# Altium PCB POD-Design-v1.0.PcbDoc (part 7 of 8)
Units mil, origin at the board's own origin, x right, y up, seen from the top; angles counter-clockwise.
Board outline 5511.81 x 3937.01 mil, 4 copper layers (Top Layer, Layer 1, Layer 2, Bottom Layer), stack 61.653 mil thick; 347 components, 252 nets, 1015 pads, 412 vias.
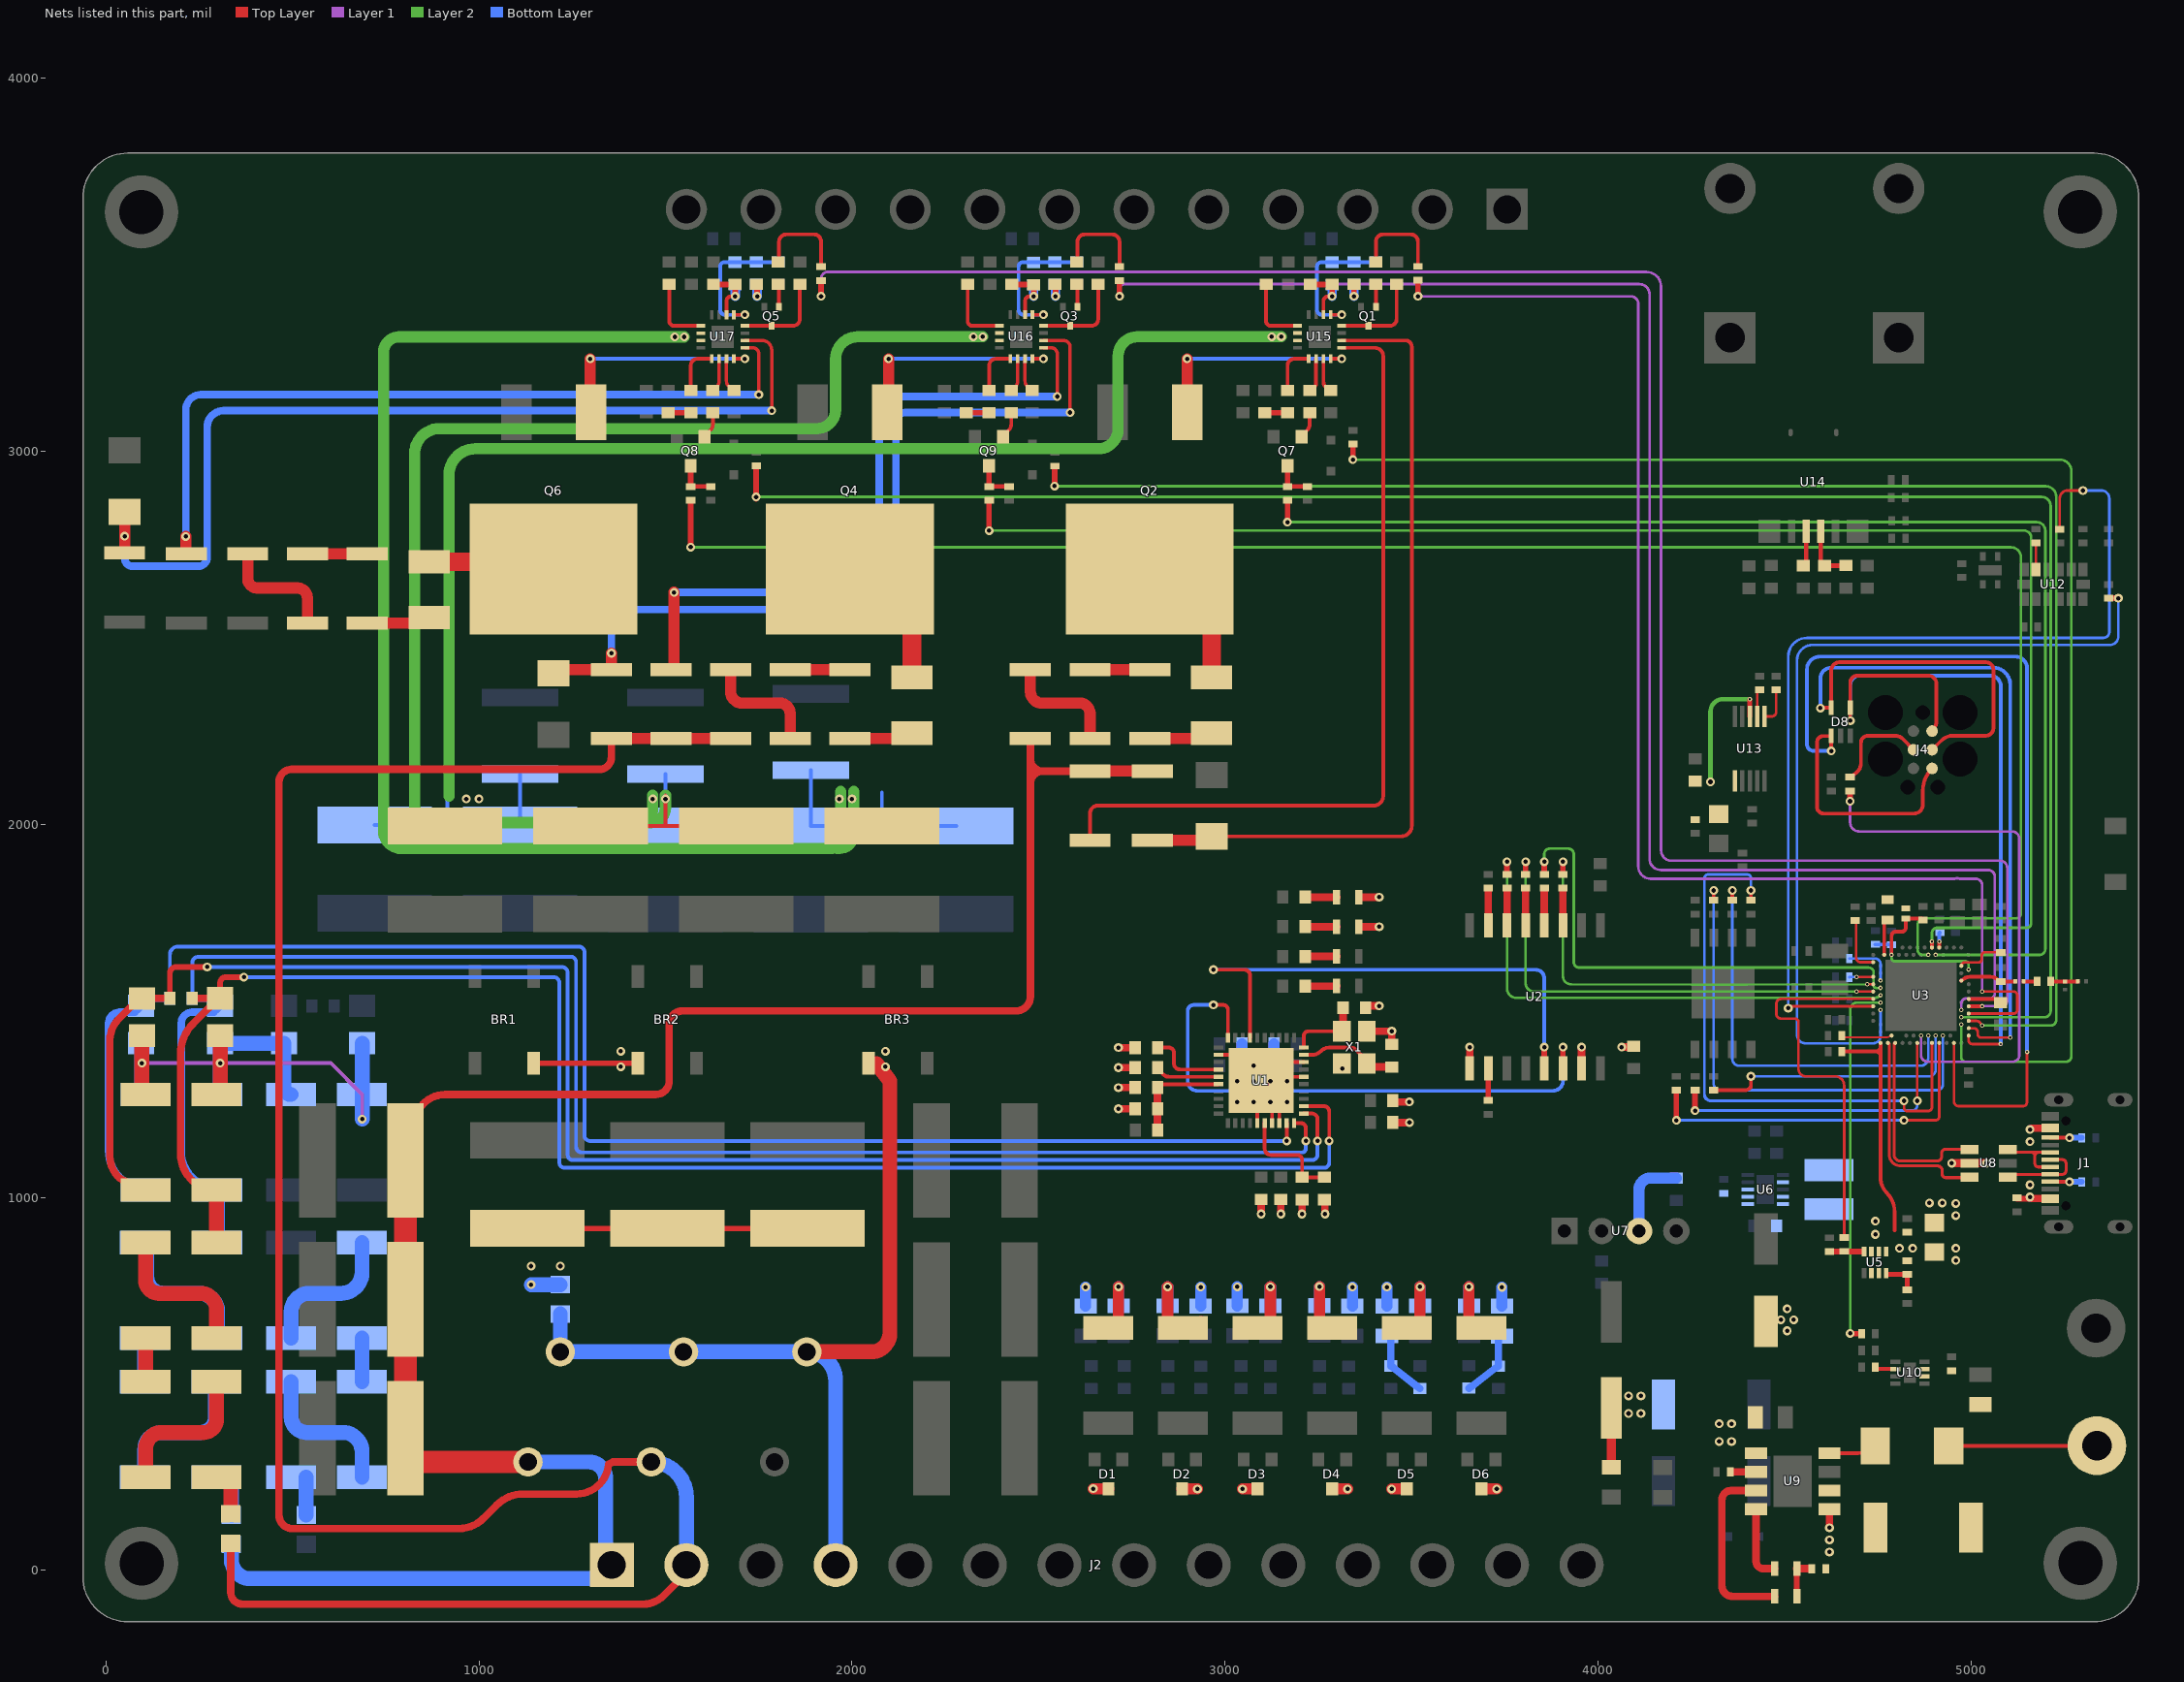
[diagram p5: the nets of this part, all layers, seen from the top]

## Via types
v1: diameter 23.62, hole 11.81, Top Layer to Bottom Layer, tented both sides, 381 vias
v2: diameter 11.81, hole 5.91, Top Layer to Bottom Layer, tented both sides, 30 vias
v3: diameter 15.75, hole 5.91, Top Layer to Bottom Layer, tented both sides, 1 vias

## Nets (pads, with @x,y where several pads share a name; then routed paths per layer and width w, separated by ;. In a path a pad name is that pad's centre, name@x,y a point inside that pad or via, vN(x,y) a via of type N, cw(c..) or ccw(c..) an arc to the next point about the centre after c; other vN are vias at no path point) (continued)
NetC9_2: C9.2 U1.30 X1.3 | length 209.7
  Top Layer w10: U1.30@3210.97,1402.08 3210.97,1432.27 cw(c3224.41,1432.27) 3224.41,1445.71 X1.3@3313.03,1445.71 ccw(c3313.03,1449.17) X1.3@3316.5,1449.17
  Top Layer w20: X1.3@3316.5,1449.17 C9.2@3316.5,1513.5
NetC10_2: C10.2 U1.29 X1.1 | length 236.6
  Top Layer w10: U1.29@3210.97,1382.4 3233.48,1382.4 ccw(c3233.48,1415.69) 3257.02,1392.15 ; 3257.04,1392.18 cw(c3280.56,1368.62) 3280.56,1401.9 3334.3,1401.9 cw(c3334.3,1375.9) 3352.69,1394.28 X1.1@3363.48,1383.49 ; X1.1@3379.96,1359.09 ccw(c3389.14,1359.09) X1.1@3389.14,1349.91
  Top Layer w20: X1.1@3389.14,1349.91 C10.2@3447.1,1349.91
NetC11_2: C11.2 R15.2 R16.1 | length 179.9
  Bottom Layer w20: C11.2@3444.17,629.42 R15.2@3444.17,548.28 3451.67,543.28 3515.08,493.28 R16.1@3522.58,488.28
NetC13_1: C13.1 R19.2 R20.1 | length 179.3
  Bottom Layer w20: R20.1@3654.16,488.79 3661.66,493.79 3725.08,542.76 R19.2@3732.58,547.76 C13.1@3732.58,628.9
NetC35_2: C35.2 C36.2 C44.1 L1.2 U3.B5 U3.E24 | length 483.6
  Top Layer w10: v2(4786.87,1650.41) 4786.87,1701.68 cw(c4797.46,1701.68) 4797.46,1712.26 4813.78,1712.26 ccw(c4813.78,1723.57) 4825.09,1723.57 L1.2@4825.09,1747.22 4868.04,1747.22 cw(c4868.04,1743.63) C35.2@4871.63,1743.63
  Layer 2 w7: v2(4786.87,1650.41) 4786.87,1641.46 ccw(c4794.94,1641.46) 4794.94,1633.39 4983.66,1633.39 cw(c4983.66,1623.48) 4993.57,1623.48 v2(4993.57,1611.04)
  Bottom Layer w10: C36.2@4743.6,1678.2 4786.87,1678.2 C44.1@4786.87,1677.5 v2(4786.87,1650.41)
NetC37_1: C37.1 U3.A18 | length 40.9
  Top Layer w10: U3.A18@4914.83,1670.09 v2(4914.83,1686.01)
  Bottom Layer w10: v2(4914.83,1686.01) 4914.83,1708.3 cw(c4916.57,1708.3) C37.1@4916.57,1710.05
NetC42_1: C42.1 U3.D23 | length 130.7
  Top Layer w7: U3.D23@4973.88,1620.88 cw(c4982.95,1620.88) 4982.95,1629.95 5020.05,1629.95 ccw(c5020.05,1638.37) 5028.46,1638.37 5028.46,1648.59 cw(c5036.88,1648.59) 5036.88,1657.01 C42.1@5079.62,1657.01
NetC43_2: C43.2 U3.C1 | length 152.4
  Top Layer w7: C43.2@4692,1742.5 4692,1642.46 ccw(c4703.73,1642.46) 4703.73,1630.72 U3.C1@4737.66,1630.72
NetC45_1: C45.1 L3.2 | length 36.4
  Top Layer w10: L3.2@5140.63,1578.87 C45.1@5176.99,1578.87
NetC45_2: C45.2 L4.1 L5.2 | length 72.5
  Top Layer w10: C45.2@5213.99,1578.87 L4.1@5286.49,1578.88
NetC48_2: C48.2 L3.1 U3.H23 | length 151.6
  Top Layer w10: U3.H23@4973.88,1581.51 4982.94,1587.51 ccw(c4973.88,1601.2) 4983.63,1588 cw(c4989.54,1579.92) 4986.06,1589.3 cw(c4997.68,1557.71) 4997.68,1591.37 5051.59,1591.37 cw(c5051.59,1562.35) 5072.11,1582.87 5076.11,1578.87 C48.2@5079.61,1578.87 L3.1@5118.98,1578.87
NetC49_2: C49.2 U3.N24 | length 89.2
  Top Layer w10: U3.N24@4993.57,1532.3 5074.07,1532.3 cw(c5074.07,1526.76) C49.2@5079.61,1526.76
NetC51_2: C51.2 U3.AC5 | length 136.2
  Top Layer w5: C51.2@4653.5,1433.87 4657.66,1429.72 4775.26,1429.72 ccw(c4775.26,1443.91) 4785.3,1433.87 U3.AC5@4786.87,1433.87
NetC60_2: C60.2 U6.6 U6.7 U6.8
NetC69_2: C69.2 C70.2 FB6.1 U13.1 U13.8 | length 359
  Top Layer w12: U13.8@4406.71,2289.37 v2(4406.71,2335.72)
  Layer 2 w12: v1(4301.42,2114.02) 4301.42,2302.36 cw(c4334.78,2302.36) 4334.78,2335.72 v2(4406.71,2335.72)
NetC72_1: C72.1 R84.2 R85.2 | length 158.7
  Top Layer w25: R84.2@4035.43,276.85 C72.1@4035.43,435.51
  other v1: 4081.76,421 4115,421 4081.76,468.24 4115,468.24
NetC75_2: C75.2 U14.3 | length 95.4
  Top Layer w10: C75.2@4549.67,2693.59 C75.2@4557.91,2701.83
  Top Layer w12: C75.2@4557.91,2701.83 U14.3@4557.91,2785.6
NetC77_2: C77.2 R88.2 U14.4 | length 152.3
  Top Layer w10: C77.2@4597.28,2702.11 ccw(c4613.04,2702.11) C77.2@4601.89,2690.96 ; C77.2@4607.98,2693.58 C77.2@4608.02,2693.62
  Top Layer w12: C77.2@4597.28,2702.11 U14.4@4597.28,2785.6 ; C77.2@4608.02,2693.62 R88.2@4664.35,2693.62
NetC82_2: C82.2 R99.2 R102.2 R104.2 U15.2 U15.3 | length 4022.3
  Layer 2 w30: 919.23,2075.46 919.23,2935.69 cw(c990.63,2935.69) 990.63,3007.08 2660.61,3007.08 ccw(c2660.61,3059.89) 2713.43,3059.89 2713.43,3256.12 cw(c2764.3,3256.12) 2764.3,3307 v1(3125.18,3307) v1(3150.79,3307)
  Bottom Layer w10: R99.2@720,1998.11 914.99,1998.11 ; 914.99,2105.55 914.99,1998.11 ; C82.2@1110,2135 R104.2@1110,1998.11 914.99,1998.11
  other v1: 966,2068.08 1000,2068.08
NetC83_2: C83.2 R100.1 R105.2 U15.14 | length 193.1
  Top Layer w10: U15.14@3263.86,3366.03 3263.86,3375.8 3263.86,3402.6 cw(c3276.79,3402.6) 3276.79,3415.54 3287.23,3415.54 v1@3287.44,3415.73 ; R100.1@3287.44,3443.17 R100.1@3287.44,3447.41
  Top Layer w15: C83.2@3229.04,3447.4 3287.43,3447.4 v1@3287.43,3415.73
  Bottom Layer w25: v1(3287.02,3415.73) R105.2@3287.02,3446.88
NetC84_2: C84.2 U15.1 | length 190.1
  Top Layer w10: C84.2@3110.16,3447.4 3110.16,3349.24 ccw(c3122.85,3349.24) 3122.85,3336.56 U15.1@3194.88,3336.56
NetC85_1: C85.1 R106.1 | length 61.7
  Top Layer w10: C85.1@3106.7,3102.95 C85.1@3106.7,3103.47
  Top Layer w15: C85.1@3106.7,3103.47 R106.1@3167.88,3103.47
NetC86_2: C86.2 R105.1 R149.1 U15.13 | length 383.9
  Top Layer w10: U15.13@3284.13,3366.15 v1(3312.99,3366.14)
  Bottom Layer w10: v1(3312.99,3366.14) 3259.42,3366.14 cw(c3259.42,3378.81) 3246.75,3378.81 3246.75,3495.95 cw(c3257.69,3495.95) 3257.69,3506.88 R105.1@3287.02,3506.88 3404.44,3506.88 C86.2@3404.44,3507.4
NetC87_2: C87.2 Q1.3 U15.12 | length 250.3
  Top Layer w10: U15.12@3312.99,3336.56 Q1.3@3384.75,3336.61 Q1.3@3384.75,3336.61 3442.28,3336.61 ccw(c3442.28,3354.34) 3460,3354.34 C87.2@3460,3447.4
NetC88_2: C88.2 R114.2 U15.10 | length 2199.2
  Top Layer w10: C88.2@2954.07,1957.68 ccw(c2954.07,1967.81) C88.2@2964.21,1967.81 3472.09,1967.81 ccw(c3472.09,1996.41) 3500.69,1996.41 3500.69,3280.33 ccw(c3483.77,3280.33) 3483.77,3297.25 U15.10@3312.99,3297.25
  Top Layer w30: R114.2@2804.87,1957.68 C88.2@2954.07,1957.68
NetC91_2: C91.2 R116.2 R119.2 R121.2 U16.2 U16.3 | length 4163.6
  Top Layer w10: R119.2@1299.22,1996.22 1500,1996.22 ; v1@1500,2078.08 1500,1996.22 ; R116.2@1689.61,1996.22 1500,1996.22
  Layer 2 w30: 1426.51,2004.9 ccw(c1426.51,2044.39) 1466,2044.39 v1@1466,2078.08 ; v1@1500,2078.08 1500,2044.39 cw(c1460.51,2044.39) 1460.51,2004.9 877.78,2004.9 cw(c877.78,2055.1) 827.58,2055.1 827.58,2993.84 cw(c894.85,2993.84) 894.85,3061.11 1906.34,3061.11 ccw(c1906.34,3110.88) 1956.1,3110.88 1956.1,3248.03 cw(c2015.07,3248.03) 2015.07,3307 v1(2350.79,3307)
  Bottom Layer w10: R121.2@1500,1996.22 1500,2078.08 C91.2@1500,2135
  other v1: 1466,2068.08 1500,2068.08 2325.18,3307
NetC92_2: C92.2 R117.1 R122.2 U16.14 | length 193.1
  Top Layer w10: U16.14@2463.86,3366.03 2463.86,3375.8 2463.86,3402.6 cw(c2476.79,3402.6) 2476.79,3415.54 2487.23,3415.54 v1@2487.44,3415.73 ; R117.1@2487.44,3443.17 R117.1@2487.44,3447.41
  Top Layer w15: C92.2@2429.04,3447.4 2487.43,3447.4 v1@2487.43,3415.73
  Bottom Layer w25: v1(2487.02,3415.73) R122.2@2487.02,3446.88
NetC93_2: C93.2 U16.1 | length 190.1
  Top Layer w10: C93.2@2310.16,3447.4 2310.16,3349.24 ccw(c2322.85,3349.24) 2322.85,3336.56 U16.1@2394.88,3336.56
NetC94_1: C94.1 R123.1 | length 61.7
  Top Layer w10: C94.1@2306.7,3102.95 C94.1@2306.7,3103.47
  Top Layer w15: C94.1@2306.7,3103.47 R123.1@2367.88,3103.47
NetC95_2: C95.2 R122.1 R151.1 U16.13 | length 383.9
  Top Layer w10: U16.13@2484.13,3366.15 v1(2512.99,3366.14)
  Bottom Layer w10: v1(2512.99,3366.14) 2459.42,3366.14 cw(c2459.42,3378.81) 2446.75,3378.81 2446.75,3495.95 cw(c2457.69,3495.95) 2457.69,3506.88 R122.1@2487.02,3506.88 2604.44,3506.88 C95.2@2604.44,3507.4
NetC96_2: C96.2 Q3.3 U16.12 | length 250.3
  Top Layer w10: U16.12@2512.99,3336.56 Q3.3@2584.75,3336.61 Q3.3@2584.75,3336.61 2642.28,3336.61 ccw(c2642.28,3354.34) 2660,3354.34 C96.2@2660,3447.4
NetC97_2: C97.2 R131.2 U16.10 | length 2303.6
  Top Layer w9: U16.10@2512.57,3297.13 2567.39,3297.13 cw(c2567.39,3279.79) 2584.73,3279.79 v1(2584.73,3104.09)
  Top Layer w10: C97.2@1200,2404.85 cw(c1210.13,2404.85) C97.2@1210.13,2414.98
  Top Layer w30: C97.2@1210.13,2414.98 R131.2@1355,2414.98 v1(1355,2459)
  Bottom Layer w20: v1(1355,2459) 1355,2549.11 cw(c1382.03,2549.11) 1382.03,2576.14 2090.63,2576.14 ccw(c2090.63,2603.51) 2118,2603.51 2118,3079.85 cw(c2142.25,3079.85) 2142.25,3104.09 v1(2584.73,3104.09)
NetC100_2: C100.2 R133.2 R136.2 R138.2 U17.2 U17.3 | length 4362.9
  Top Layer w10: R136.2@2054.39,2021.83 R136.2@2080,1996.22
  Layer 2 w30: v1(1550.38,3306.88) v1(1524.77,3306.88) 785.88,3306.88 ccw(c785.88,3265) 744,3265 744,1983.84 ccw(c792.61,1983.84) 792.61,1935.23 1928.25,1935.23 ; 1928.16,1935.23 ccw(c1928.16,1970.46) 1928.25,1935.23 ; 1946.12,1935.23 1928.25,1935.23 ; 1960.51,1934.9 ccw(c1960.51,1974.39) 1975.85,1938 1946.12,1938 ; 1970.26,1974.39 cw(c1930.77,1974.39) 1946.12,1938 ; 1970.26,1983.35 1970.26,2088.08 ; 1980.12,1938 ccw(c1964.77,1974.39) 2004.26,1974.39 ; 2004.26,1995.94 2004.26,2088.08 ; 1928.25,1935.23 ccw(c1928.16,1970.46) 1941.85,1938 1946.12,1938
  Bottom Layer w10: C100.2@1890,2145 R138.2@1890,1995.94 2085,1995.94 ; 2080,2085.87 2080,2000.94 ccw(c2085,2000.94) 2085,1995.94 ; R133.2@2280,1996.22 2280,1995.94 2085,1995.94
  other v1: 1966,2068.08 2000,2068.08
NetC101_2: C101.2 R134.1 R139.2 U17.14 | length 193.1
  Top Layer w10: U17.14@1663.44,3366.03 1663.44,3375.8 1663.44,3402.6 cw(c1676.38,3402.6) 1676.38,3415.53 1686.82,3415.53 v1(1687.02,3415.73) ; R134.1@1687.02,3443.17 R134.1@1687.01,3447.4
  Top Layer w15: C101.2@1628.63,3447.39 R134.1@1687.01,3447.4 v1(1687.02,3415.73)
  Bottom Layer w25: v1(1687.02,3415.73) R139.2@1687.02,3446.88
NetC102_2: C102.2 U17.1 | length 190.1
  Top Layer w10: C102.2@1510.16,3447.4 1510.16,3349.24 ccw(c1522.85,3349.24) 1522.85,3336.56 U17.1@1594.88,3336.56
NetC103_1: C103.1 R140.1 | length 61.7
  Top Layer w10: C103.1@1506.7,3102.95 C103.1@1506.7,3103.47
  Top Layer w15: C103.1@1506.7,3103.47 R140.1@1567.88,3103.47
NetC104_2: C104.2 R139.1 R150.1 U17.13 | length 383.9
  Top Layer w10: U17.13@1684.13,3366.15 v1(1712.99,3366.14)
  Bottom Layer w10: v1(1712.99,3366.14) 1659.42,3366.14 cw(c1659.42,3378.81) 1646.75,3378.81 1646.75,3495.95 cw(c1657.69,3495.95) 1657.69,3506.88 R139.1@1687.02,3506.88 1804.44,3506.88 C104.2@1804.44,3507.4
NetC105_2: C105.2 Q5.3 U17.12 | length 250.3
  Top Layer w10: U17.12@1712.99,3336.56 Q5.3@1784.75,3336.61 Q5.3@1784.75,3336.61 1842.28,3336.61 ccw(c1842.28,3354.34) 1860,3354.34 C105.2@1860,3447.41
NetC106_2: C106.2 R148.2 U17.10 | length 2564.8
  Top Layer w9: U17.10@1712.57,3297.13 1759.3,3297.13 cw(c1759.3,3271.69) 1784.73,3271.69 v1@1784.73,3104.09
  Top Layer w30: R148.2@44.57,2732.95 ccw(c50,2732.95) R148.2@50,2727.52 ; C106.2@44.57,2832.19 cw(c50,2832.19) C106.2@50,2837.62 ; R148.2@50,2732.95 v1(50,2772.43) C106.2@50,2832.19
  Bottom Layer w20: v1(50,2772.43) 50,2713.42 ccw(c71.42,2713.42) 71.42,2692 248.03,2692 ccw(c248.03,2715.36) 271.39,2715.36 271.39,3065.18 cw(c315.3,3065.18) 315.3,3109.09 v1(1784.73,3109.09)
NetC107_1: C107.1 R149.2 | length 63.4
  Top Layer w10: v1@3345.71,3415.73 v1(3345.77,3415.73)
  Top Layer w15: v1@3345.71,3415.73 C107.1@3345.71,3447.38
  Bottom Layer w10: v1@3345.71,3415.73 v1(3345.77,3415.73)
  Bottom Layer w25: v1@3345.71,3415.73 R149.2@3345.71,3447.38
NetC108_1: C108.1 R150.2 | length 63.4
  Top Layer w10: v1@1745.71,3415.73 v1(1745.77,3415.73)
  Top Layer w15: v1@1745.71,3415.73 C108.1@1745.71,3447.38
  Bottom Layer w10: v1@1745.71,3415.73 v1(1745.77,3415.73)
  Bottom Layer w25: v1@1745.71,3415.73 R150.2@1745.71,3447.38
NetC109_1: C109.1 R151.2 | length 63.4
  Top Layer w10: v1@2545.71,3415.73 v1(2545.77,3415.73)
  Top Layer w15: v1@2545.71,3415.73 C109.1@2545.71,3447.38
  Bottom Layer w10: v1@2545.71,3415.73 v1(2545.77,3415.73)
  Bottom Layer w25: v1@2545.71,3415.73 R151.2@2545.71,3447.38
NetD9_1: D9.1 Q2.2 | length 413.3
  Top Layer w10: Q2.2@2798.2,2684.38 2864.21,2684.38 cw(c2864.21,2584.38) Q2.2@2964.21,2584.38
  Top Layer w50: D9.1@2964.21,2394.15 Q2.2@2964.21,2584.38
NetD9_2: D9.2 R112.2 | length 174.2
  Top Layer w30: R112.2@2798.36,2229.92 2949.59,2229.92 ccw(c2949.59,2244.54) D9.2@2964.21,2244.54
NetD10_1: D10.1 Q4.2 | length 413.3
  Top Layer w10: Q4.2@1994.47,2684.38 2060.48,2684.38 cw(c2060.48,2584.38) Q4.2@2160.48,2584.38
  Top Layer w50: D10.1@2160.48,2394.15 Q4.2@2160.48,2584.38
NetD10_2: D10.2 R129.2 | length 174.2
  Top Layer w30: R129.2@1994.63,2229.92 2145.86,2229.92 ccw(c2145.86,2244.54) D10.2@2160.48,2244.54
NetD11_1: D11.1 Q6.2 | length 342.2
  Top Layer w10: Q6.2@1180.23,2704.15 Q6.2@1200,2684.38
  Top Layer w50: D11.1@866.01,2704.15 Q6.2@1180.23,2704.15
NetD11_2: D11.2 R146.2 | length 174.2
  Top Layer w30: R146.2@700.16,2539.92 851.39,2539.92 ccw(c851.39,2554.54) D11.2@866.01,2554.54
NetFB1_2: FB1.2 R30.1 | length 101.3
  Bottom Layer w40: FB1.2@336.39,148.82 R30.1@336.39,250.08
NetFB2_2: FB2.2 R36.1 | length 101.4
  Top Layer w15: R36.1@296.39,250.08 cw(c296.39,244.89) R36.1@301.58,244.89
  Top Layer w40: FB2.2@334.58,151.68 R36.1@334.58,244.89
NetFB3_2: FB3.2 R42.1 | length 101.3
  Bottom Layer w40: FB3.2@536.52,148.82 R42.1@536.52,250.08
NetJ4_3: J4.3 R91.1 | length 270.9
  Top Layer w10: R91.1@4675.62,2126.62 4683.12,2130.62 4695.11,2141.38 ccw(c4675.62,2163.13) 4704.83,2163.13 4704.83,2219.18 cw(c4723.37,2219.18) 4723.37,2237.73 4796,2237.73 cw(c4796,2208.72) 4816.51,2229.23 J4.3@4845.61,2200.13
NetL1_1: L1.1 L2.2
NetL2_1: L2.1 U3.B3 | length 97
  Top Layer w10: U3.B3@4767.19,1650.41 4767.19,1734.42 L2.1@4776.4,1743.63
NetL6_1: L6.1 U6.4
NetL6_2: L6.2 U6.2
NetL7_1: L7.1 U9.8 | length 128.3
  Top Layer w10: U9.8@4620.33,314.41 4696.14,314.41 ccw(c4696.14,381.21) L7.1@4743.38,333.98
NetLED1_1: LED1.1 R26.1 | length 84.3
  Top Layer w20: R26.1@3215.19,1725.58 LED1.1@3299.47,1725.58
NetLED2_1: LED2.1 R27.1 | length 84.3
  Top Layer w20: R27.1@3215.19,1804.99 LED2.1@3299.47,1805
NetLED3_1: LED3.1 R28.1 | length 84.3
  Top Layer w20: R28.1@3215.19,1566.75 LED3.1@3299.47,1566.75
NetLED4_1: LED4.1 R29.1 | length 84.3
  Top Layer w20: R29.1@3215.19,1646.16 LED4.1@3299.47,1646.17
NetLED5_1: LED5.1 LED6.1 R73.2 | length 108.3
  Top Layer w15: LED5.1@4532.78,-69.32 LED6.1@4532.78,5
  Top Layer w20: LED6.1@4532.78,5 R73.2@4566.75,5
NetLED5_2: LED5.2 U9.3 | length 493.8
  Top Layer w20: U9.3@4423.68,214.41 4356.95,214.41 ccw(c4356.95,189.67) 4332.21,189.67 4332.21,-40.74 ccw(c4360.79,-40.74) 4360.79,-69.32 LED5.2@4473.73,-69.32
NetLED6_2: LED6.2 U9.4 | length 201
  Top Layer w20: U9.4@4423.68,164.41 4423.68,24.69 ccw(c4443.37,24.69) 4443.37,5 LED6.2@4473.73,5
NetQ1_1: Q1.1 R109.1 | length 60
  Top Layer w10: Q1.1@3404.44,3387.4 R109.1@3404.44,3447.4
NetQ2_1: Q2.1 U15.8 | length 587.3
  Top Layer w10: U15.8@3284.02,3248.04 v1(3312.99,3248.03)
  Top Layer w30: Q2.1@2898.2,3104.45 v1(2898.2,3248.03)
  Bottom Layer w10: v1(2898.2,3248.03) v1(3312.99,3248.03)
NetQ3_1: Q3.1 R126.1 | length 60
  Top Layer w10: Q3.1@2604.44,3387.4 R126.1@2604.44,3447.4
NetQ4_1: Q4.1 U16.8 | length 587.3
  Top Layer w10: U16.8@2484.02,3248.04 v1(2512.99,3248.04)
  Top Layer w30: Q4.1@2098.2,3104.45 v1(2098.2,3248.03)
  Bottom Layer w10: v1(2098.2,3248.03) v1(2512.99,3248.04)
NetQ5_1: Q5.1 R143.1 | length 60
  Top Layer w10: Q5.1@1804.44,3387.4 R143.1@1804.44,3447.4
NetQ6_1: Q6.1 U17.8 | length 587.3
  Top Layer w10: U17.8@1684.02,3248.04 v1@1712.99,3248.04
  Top Layer w30: Q6.1@1298.2,3104.45 v1(1298.2,3248.03)
  Bottom Layer w10: v1(1298.2,3248.03) v1@1712.99,3248.03
  other v1: 1712.58,3248.03
NetQ7_1: Q7.1 R156.2 | length 71.5
  Top Layer w10: Q7.1@3204.94,3039.64 3216.08,3052.75 3220.18,3056.69 ccw(c3204.94,3072.53) 3226.92,3072.53 R156.2@3226.92,3103.47
NetQ8_1: Q8.1 R158.2 | length 71.5
  Top Layer w10: Q8.1@1604.94,3039.64 1616.08,3052.75 1620.18,3056.69 ccw(c1604.94,3072.53) 1626.92,3072.53 R158.2@1626.92,3103.47
NetQ9_1: Q9.1 R160.2 | length 71.5
  Top Layer w10: Q9.1@2404.94,3039.64 2416.08,3052.75 2420.18,3056.69 ccw(c2404.94,3072.53) 2426.92,3072.53 R160.2@2426.92,3103.47
NetR7_2: R7.2 U1.4 | length 208.7
  Top Layer w10: R7.2@2819.01,1401.7 2849.29,1401.7 cw(c2849.29,1388.04) 2862.95,1388.04 2862.95,1359.58 ccw(c2879.49,1359.58) 2879.49,1343.03 U1.4@2982.03,1343.03
NetR8_2: R8.2 U1.5 | length 173.3
  Top Layer w10: R8.2@2819.01,1348.16 2829.01,1335.66 2831.61,1332.47 ccw(c2850.84,1348.16) 2850.84,1323.34 U1.5@2982.03,1323.34
NetR21_2: R21.2 U2.7 | length 97.6
  Top Layer w20: U2.7@3705.93,1729.37 R21.2@3705.93,1826.98
NetR22_1: R22.1 U2.10 | length 85.6
  Top Layer w15: R22.1@3705.93,1259.94 U2.10@3705.93,1345.51
NetR30_2: R30.2 R31.1 | length 408.8
  Bottom Layer w40: R31.1@103.99,250.08 103.99,324.42 cw(c149.57,324.42) 149.57,370 253.02,370 ccw(c253.02,410.96) 293.99,410.96 R30.2@293.99,505.99
NetR31_2: R31.2 R32.1 | length 117.1
  Bottom Layer w40: R31.2@103.99,505.99 R32.1@103.99,623.05
NetR32_2: R32.2 R33.1 | length 405.6
  Bottom Layer w40: R32.2@109.37,878.96 109.37,787.94 ccw(c154.34,787.94) 154.34,742.97 250.38,742.97 cw(c250.38,693.99) 299.37,693.99 R33.1@299.37,623.05
NetR36_2: R36.2 R37.1 | length 412.2
  Top Layer w40: R37.1@106.39,250.08 106.39,326.39 cw(c150,326.39) 150,370 261.39,370 ccw(c261.39,405) 296.39,405 R36.2@296.39,505.99
NetR37_2: R37.2 R38.1 | length 117.1
  Top Layer w40: R37.2@106.39,505.99 R38.1@106.39,623.05
NetR38_2: R38.2 R39.1 | length 412.2
  Top Layer w40: R38.2@106.39,878.96 106.39,777.97 ccw(c141.39,777.97) 141.39,742.97 252.78,742.97 cw(c252.78,699.36) 296.39,699.36 R39.1@296.39,623.05
NetR42_2: R42.2 R43.1 | length 405.7
  Bottom Layer w40: R42.2@496.52,505.99 496.52,411.54 ccw(c538.06,411.54) 538.06,370 634.5,370 cw(c634.5,317.98) 686.52,317.98 R43.1@686.52,250.08
NetR43_2: R43.2 R44.1 | length 117.1
  Bottom Layer w40: R43.2@686.52,505.99 R44.1@686.52,623.05
NetR44_2: R44.2 R45.1 | length 400.6
  Bottom Layer w40: R45.1@496.52,623.05 496.52,693.99 cw(c545.5,693.99) 545.5,742.97 629.97,742.97 ccw(c629.97,799.52) 686.52,799.52 R44.2@686.52,878.96
NetR68_1: R68.1 R69.2 U5.4 | length 99.8
  Top Layer w9: U5.4@4772.53,797.3 4772.53,795.53 U5.4@4774.33,793.74
  Top Layer w12: U5.4@4774.33,793.74 R68.1@4828.83,793.74 R69.2@4828.82,752.74
NetR74_1: R74.1 U9.6
NetR75_2: R75.2 U9.2 | length 64.2
  Top Layer w20: R75.2@4359.44,264.41 U9.2@4423.68,264.41
NetR77_2: R77.2 U10.6 | length 53.7
  Top Layer w10: R77.2@4743.38,540.15 U10.6@4797.05,540.15
NetR80_2: R80.2 U12.12 | length 71.5
  Top Layer w7: U12.12@5174.02,2683.11 R80.2@5174.02,2754.64
NetR81_2: R81.2 U13.6 | length 96.9
  Top Layer w7: U13.6@4446.08,2289.37 4465.13,2289.37 ccw(c4465.13,2302.07) 4477.83,2302.07 R81.2@4477.83,2359.93
NetR83_2: R83.2 U13.7 | length 71.3
  Top Layer w7: U13.7@4426.39,2289.37 R83.2@4426.39,2360.69
NetR106_2: R106.2 U15.5 | length 133
  Top Layer w10: R106.2@3167.88,3163.47 3167.88,3230.54 cw(c3185.38,3230.54) 3185.38,3248.04 U15.5@3223.81,3248.04
NetR108_2: R108.2 U15.7 | length 93.7
  Top Layer w10: U15.7@3263.86,3248.04 3263.86,3186.31 ccw(c3283.48,3186.31) 3270.98,3171.19 R108.2@3283.48,3163.47
NetR110_2: R110.2 R111.1 | length 319.9
  Top Layer w30: R110.2@2478.2,2414.96 2478.21,2356.52 ccw(c2509.73,2356.52) 2509.73,2325 2610.73,2325 cw(c2610.73,2298) 2637.73,2298 2638.2,2298 R111.1@2638.2,2229.92
NetR111_2: R111.2 R112.1 | length 160.2
  Top Layer w30: R111.2@2638.2,2414.96 R112.1@2798.36,2414.96
NetR113_2: R113.2 U15.9 | length 2187.5
  Top Layer w10: R113.2@2638.2,1957.68 2638.2,2029.86 cw(c2658.54,2029.86) 2658.54,2050.2 3398.38,2050.2 ccw(c3398.38,2075.79) 3423.98,2075.79 3423.98,3255.62 ccw(c3402.04,3255.62) 3402.04,3277.57 U15.9@3312.99,3277.57
NetR123_2: R123.2 U16.5 | length 133
  Top Layer w10: R123.2@2367.88,3163.47 2367.88,3230.54 cw(c2385.38,3230.54) 2385.38,3248.04 U16.5@2423.81,3248.04
NetR125_2: R125.2 U16.7 | length 93
  Top Layer w9: U16.7@2463.86,3248.04 2463.86,3196.41 2463.86,3188.62 ccw(c2483.9,3188.62) 2470.9,3173.37 R125.2@2483.9,3163.59
NetR127_2: R127.2 R128.1 | length 319.9
  Top Layer w30: R127.2@1674.47,2414.96 1674.47,2356.53 ccw(c1706,2356.53) 1706,2325 1807,2325 cw(c1807,2298) 1834,2298 1834.47,2298 R128.1@1834.47,2229.93
NetR128_2: R128.2 R129.1 | length 160.2
  Top Layer w30: R128.2@1834.47,2414.97 R129.1@1994.63,2414.96
NetR130_2: R130.2 U16.9 | length 1906.1
  Top Layer w9: U16.9@2512.57,3277.45 2534.5,3277.45 cw(c2534.5,3261.81) 2550.14,3261.81 v1(2550.14,3146.97)
  Top Layer w30: R130.2@1515,2414.97 1520.28,2414.97 1523,2417.69 v1(1523,2622) v1@1523,2622.78
  Bottom Layer w20: v1(1523,2622) 2047.92,2622 ccw(c2047.92,2647.18) 2073.1,2647.18 2073.1,3121.82 cw(c2098.25,3121.82) 2098.25,3146.97 v1(2550.14,3146.97)
NetR140_2: R140.2 U17.5 | length 133
  Top Layer w10: R140.2@1567.88,3163.47 1567.88,3230.54 cw(c1585.38,3230.54) 1585.38,3248.04 U17.5@1623.81,3248.04
NetR142_2: R142.2 U17.7 | length 93
  Top Layer w9: U17.7@1663.44,3248.04 1663.44,3196.42 1663.44,3188.62 ccw(c1683.48,3188.62) 1670.48,3173.37 R142.2@1683.48,3163.6
NetR144_2: R144.2 R145.1 | length 322.7
  Top Layer w30: R144.2@380,2724.96 380,2659.14 ccw(c405.34,2659.14) 405.34,2633.8 513.2,2633.8 cw(c513.2,2607) 540,2607 R145.1@540,2539.92
NetR145_2: R145.2 R146.1 | length 160.2
  Top Layer w30: R145.2@540,2724.96 R146.1@700.16,2724.96
NetR147_2: R147.2 U17.9 | length 2107.8
  Top Layer w9: U17.9@1712.57,3277.45 1734.5,3277.45 cw(c1734.5,3261.81) 1750.14,3261.81 v1@1750.14,3146.97
  Top Layer w30: v1(214,2772) 214,2726.48 ccw(c215.52,2726.48) R147.2@215.52,2724.96
  Bottom Layer w20: v1(214,2772) 214,3111 cw(c254.97,3111) 254.97,3151.97 v1(1750.14,3151.97)
NEUTRAL: BR1.4 BR2.3 BR3.3 FB4.1 J2.4 RV1.1 RV2.1 RV3.1 | length 2642.4
  Top Layer w15: BR1.4@1146.35,1360 BR2.3@1425.79,1360
  Top Layer w40: RV3.1@1878.83,586.2 2051.2,586.2 ccw(c2051.2,636.69) 2101.69,636.69 2101.69,1312.35 2066.13,1358.13
  Bottom Layer w40: FB4.1@1218.08,687.6 RV1.1@1218.08,586.2 RV2.1@1548.45,586.2 RV3.1@1878.83,586.2 cw(c1878.83,508.92) 1956.1,508.92 J2.4@1956.1,14.82
  other v1: 1380,1350.37 2089.73,1350.37 1380,1391.83 2089.73,1391.83
NGND: C1.1 C2.1 C3.2 C4.2 C5.1 C6.1 C7.2 C8.2 C9.1 C10.1 C11.1 C12.1 C13.2 C14.2 C16.1 C17.1 C18.1 C19.1 C20.1 C21.1 C22.1 C23.1 C24.1 C25.1 C27.1 C28.1 C30.1 C31.1 C33.1 C34.1 C62.1 D1.3 D2.3 D3.3 D4.3 D5.3 D6.3 FB4.2 LED1.2 LED2.2 R3.1 R4.2 R7.1 R8.1 R11.1 R12.2 R17.1 R18.2 R24.1 R25.2 R34.1 R35.1 R40.1 R41.1 R46.1 R47.1 SB1.1 U1.2 U1.15 U1.17 U1.18 U1.26 U1.28 U1.41 U2.9 U2.15 U7.3 X1.2 X1.4 | length 5526
  Top Layer w10: U1.2@2982.03,1382.4 3027.6,1382.4 cw(c3027.6,1313.5) U1.41@3096.5,1313.5 ; U1.41@3082.12,1287.44 cw(c3082.12,1282.9) 3086.66,1282.9 U1.15@3086.66,1199.03 ; U1.17@3126.03,1199.03 3126.03,1261.53 cw(c3128.36,1261.53) U1.41@3128.36,1263.86 ; U1.18@3145.71,1199.03 U1.41@3145.71,1264.29 ; U1.26@3210.97,1323.34 3106.34,1323.34 ccw(c3106.34,1313.5) U1.41@3096.5,1313.5 ; U1.28@3210.97,1362.71 3145.71,1362.71 ccw(c3145.71,1313.5) U1.41@3096.5,1313.5
  Top Layer w20: v1(2714.35,1237.5) SB1.1@2759.01,1237.5 ; v1(2714.35,1294.62) C17.1@2759.01,1294.62 ; v1(2714.35,1348.16) R8.1@2759.01,1348.16 ; v1(2714.35,1401.7) R7.1@2759.01,1401.7 ; v1@3096.91,957.65 R24.1@3096.91,994.5 ; v1@3149.9,957.65 R25.2@3149.9,994.5 ; v1@3206.56,957.65 C22.1@3206.56,994.03 ; C23.1@3266.56,994.03 cw(c3266.56,992.61) 3267.98,992.61 v1@3267.98,957.65 ; X1.4@3313.03,1359.09 3313.03,1346.51 v1(3313.98,1345.56) ; LED1.2@3358.52,1725.58 v1(3413.17,1725.58) ; LED2.2@3358.52,1805 v1(3413.17,1804.99) ; C9.1@3376.5,1513.5 v1(3413.17,1513.5) ; X1.2@3379.96,1445.71 v1(3447.1,1445.71) C10.1@3447.1,1409.91 ; C21.1@3449.99,1200.65 v1(3494.47,1200.65) ; C20.1@3450,1260 3453.91,1256.09 v1(3494.4,1256.09) ; U2.9@3655.93,1345.51 3656,1345.51 v1(3656,1402.98) ; U2.15@3955.93,1345.51 3955.93,1402.98 v1(3956,1402.98) ; v1(4063.21,1402.81) 4063.9,1403.5 4093.5,1403.5 C16.1@4095,1405
  Top Layer w30: v1(2646.77,219.07) 2646.93,218.91 D1.3@2687.58,218.91 D1.3@2687.74,218.75 ; R3.1@2687.58,650.58 2698.09,650.58 2714.58,667.07 v1(2714.58,760.63) ; v1(2846.17,760.63) 2846.17,667.07 2862.67,650.58 R4.2@2887.58,650.58 2918.08,650.58 R4.2@2934.58,667.07 ; D2.3@2885.01,219.07 D2.3@2885.17,218.91 2925.82,218.91 v1(2925.98,218.75) ; v1(3046.76,218.75) 3046.92,218.91 D3.3@3087.58,218.91 D3.3@3087.74,219.07 ; R11.1@3087.58,650.58 3105.09,650.58 3121.58,667.07 v1(3121.58,760.63) ; v1(3253.17,761.26) 3253.17,667.07 3269.67,650.58 R12.2@3287.58,650.58 ; D4.3@3287.41,219.06 D4.3@3287.57,218.9 3328.22,218.9 v1(3328.38,218.74) ; v1(3446.77,218.75) 3446.93,218.91 D5.3@3487.58,218.91 D5.3@3487.74,219.07 ; R17.1@3487.58,650.58 3506.08,650.58 3522.58,667.07 v1(3522.58,760.63) ; v1(3654.17,760.63) 3654.17,667.07 3670.67,650.58 R18.2@3687.58,650.58 ; D6.3@3687.41,219.07 D6.3@3687.57,218.91 3728.22,218.91 v1(3728.38,218.75)
  Top Layer w40: C31.1@96.39,1433.71 v1(96.39,1360) 96.39,1285.95 ccw(c106.39,1285.95) R41.1@106.39,1275.95 ; R40.1@296.39,1275.95 ccw(c296.39,1280.95) R40.1@301.39,1280.95 ; C30.1@301.39,1428.88 cw(c306.39,1428.88) C30.1@306.39,1433.88 ; R40.1@306.39,1280.95 v1(306.39,1360) C30.1@306.39,1428.88
  Layer 1 w10: v1(96.39,1360) v1(306.39,1360) 602.94,1360 687.07,1275.87 v1(687.07,1210)
  Bottom Layer w30: C1.1@2626.16,708.79 v1(2626.16,760) ; C2.1@2714.58,709.42 v1(2714.58,760.63) ; C4.2@2846.17,709.42 v1(2846.17,760.63) ; C3.2@2934.58,708.79 v1(2934.58,760) ; C5.1@3033.16,709.41 v1(3033.16,760.63) ; C19.1@3045.12,1411.77 C18.1@3045.12,1352.72 3088.15,1352.72 3088.15,1352.8 C24.1@3131.36,1352.8 ; C6.1@3121.58,709.42 v1(3121.58,760.63) ; C24.1@3131.36,1352.71 C24.1@3131.36,1352.8 ; C25.1@3131.71,1411.9 3131.36,1411.9 C24.1@3131.36,1352.8 ; C8.2@3253.17,710.05 v1(3253.17,761.26) ; C7.2@3341.58,708.79 v1(3341.58,760) ; C11.1@3434.17,708.79 v1(3434.17,760) ; C12.1@3522.58,709.42 v1(3522.58,760.63) ; C14.2@3654.17,709.42 v1(3654.17,760.63) ; C13.2@3742.58,708.28 v1(3742.58,759.49) ; U7.3@4110,910 4110,1021.77 cw(c4140,1021.77) 4140,1051.77 C62.1@4210,1051.77
  Bottom Layer w40: C28.1@96.39,1413.38 v1(96.39,1360) 96.39,1285.95 ccw(c106.39,1285.95) R35.1@106.39,1275.94 ; R34.1@299.37,1275.95 306.39,1282.97 v1(306.39,1360) C27.1@306.36,1413.38 ; C27.1@306.36,1413.38 C34.1@477.07,1413.38 477.07,1295.4 ccw(c496.52,1295.4) R46.1@496.52,1275.95 ; v1(687.07,1210) 687.07,1275.6 R47.1@686.52,1276.15 687.07,1276.69 C33.1@687.07,1413.38 ; v1(1140,766.34) FB4.2@1218.08,766.34
  other v1: 1140,816 1218.08,816 3096.91,955.65 3149.9,955.65 3206.56,955.65 3267.98,955.65 3032,1256.09 3076.79,1256.09 3121.58,1256.09 3166.36,1256.09 3032,1312.18 3076.79,1312.27 3121.58,1312.18 3166.36,1312.27 3076.79,1352.8
P0.04: R57.1 U3.J1 | length 1185.2
  Top Layer w7: v2(4721.75,1571.67) U3.J1@4737.66,1571.67
  Top Layer w15: R57.1@3905.93,1865.94 v1(3905.93,1900)
  Layer 2 w7: v1(3905.93,1900) 3905.93,1593.04 ccw(c3927.3,1593.04) 3927.3,1571.67 4251.59,1570.29 4398.41,1570.29 v2(4721.75,1571.67) v2@4721.97,1571.67
P0.05: R58.1 U3.K2 | length 1317
  Top Layer w15: R58.1@3855.93,1865.92 v1(3855.93,1900)
  Layer 2 w7: v1(3855.93,1900) 3855.93,1920.93 cw(c3870,1920.93) 3870,1935 3920,1935 cw(c3920,1920) 3935,1920 3935,1630.98 ccw(c3949.76,1630.98) 3949.76,1616.22 4724.2,1616.22 cw(c4724.2,1599.96) 4737.47,1609.35 cw(c4731.75,1605.33) 4738.75,1605.33 4738.75,1569.27 ccw(c4746.83,1569.27) 4746.83,1561.18 4757.35,1561.18 v2(4757.35,1561.83)
P0.06: R59.1 U3.L1 | length 1304.3
  Top Layer w7: v2(4693.43,1551.98) U3.L1@4737.66,1551.98
  Top Layer w15: R59.1@3805.93,1865.93 v1(3805.93,1900)
  Layer 2 w7: v1(3805.93,1900) 3805.93,1574.07 ccw(c3828.02,1574.07) 3828.02,1551.98 v2(4693.43,1551.98)
P0.07: R60.1 U3.M2 | length 1391.4
  Top Layer w15: R60.1@3755.93,1865.94 v1(3755.93,1900)
  Layer 2 w7: v1(3755.93,1900) 3755.93,1560.41 ccw(c3781.21,1560.41) 3781.21,1535.13 4740.43,1535.13 ccw(c4740.43,1559.06) 4749.16,1536.78 ccw(c4746.57,1543.29) 4749.76,1537.05 cw(c4757.35,1522.46) 4751.14,1537.69 ccw(c4748.46,1544.16) 4751.71,1537.96 ccw(c4740.43,1559.06) v2(4757.35,1542.14)
P0.08: R61.1 U3.N1 | length 1047.4
  Top Layer w7: R61.1@4660,892.55 4660,1299.91 ccw(c4635.27,1299.91) 4635.27,1324.64 4556.79,1324.64 cw(c4556.79,1343.92) 4537.52,1343.92 4537.52,1469.42 ccw(c4527.29,1469.42) 4527.29,1479.64 4490,1479.64 cw(c4490,1491.64) 4478,1491.64 4478,1519.27 cw(c4491.03,1519.27) 4491.03,1532.3 U3.N1@4737.66,1532.3
P0.17: R48.1 U3.AD12 | length 826
  Top Layer w7: v1(4855.77,1259) U3.AD12@4855.77,1414.19
  Top Layer w15: v1(4260,1233) R48.1@4260,1287.64
  Bottom Layer w7: v1(4260,1233) 4842.77,1233 ccw(c4842.77,1246) 4855.77,1246 v1(4855.77,1259)
P0.18/RESET: R91.2 U3.AC13 | length 1478.4
  Top Layer w15: v1(4675.62,2062) R91.2@4675.62,2089.62
  Layer 1 w7: v1(4675.62,2062) 4675.62,2006 ccw(c4700.62,2006) 4700.62,1981 5110.08,1981 cw(c5110.08,1961.91) 5129.17,1961.91 5129.17,1378.92 cw(c5110.77,1382.47) 5110.77,1363.73 4884.41,1363.73 cw(c4884.41,1382.53) 4865.61,1382.53 v2(4865.61,1433.87)
P0.19: R49.1 U3.AC15 | length 1085.6
  Top Layer w10: R49.1@4359.99,1796.64 v1(4360,1823)
  Bottom Layer w7: v1(4360,1823) 4360,1371.63 ccw(c4378.56,1371.63) 4378.56,1353.07 4864.65,1353.07 ccw(c4864.65,1373.71) 4885.3,1373.71 v2(4885.3,1433.87)
P0.20: R50.1 U3.AD16 | length 1629.4
  Top Layer w7: v1(4820.23,1259) 4820.23,1240.16 ccw(c4828.57,1240.16) 4828.57,1231.82 4884.86,1231.82 ccw(c4884.86,1242.1) 4895.14,1242.1 U3.AD16@4895.14,1414.19
  Top Layer w10: R50.1@4409.99,1796.64 v1(4410,1823)
  Bottom Layer w7: v1(4410,1823) 4410,1856 ccw(c4400,1856) 4400,1866 4295.56,1866 ccw(c4295.56,1855.57) 4285.13,1855.57 4285.13,1279.52 ; v1(4820.23,1259) 4305.65,1259 ; 4285.13,1279.52 ccw(c4305.65,1279.52) 4305.65,1259 ; 4285.13,1279.52 4285.13,1275.11 ccw(c4301.23,1275.11) 4301.23,1259 4305.65,1259
P0.21: R51.1 U3.AC17 | length 727.3
  Top Layer w10: R51.1@4309.99,1287.64 4396.92,1287.64 4404.13,1290.72 4408.9,1295.48 ccw(c4396.92,1300.72) 4409.99,1300.72 v1(4409.99,1324.64)
  Bottom Layer w7: v1(4409.99,1324.64) 4887.03,1324.64 ccw(c4887.03,1342.6) 4904.98,1342.6 v2(4904.98,1433.87)
P0.22: R52.1 U3.AD18 | length 988.5
  Top Layer w7: v1(4820.23,1207) 4905.22,1207 ccw(c4905.22,1216.61) 4914.83,1216.61 U3.AD18@4914.83,1414.19
  Top Layer w15: v1(4210.01,1207) R52.1@4210.01,1287.64
  Bottom Layer w7: v1(4210.01,1207) v1(4820.23,1207)
P0.23: R53.1 U3.AC19 | length 1308.4
  Top Layer w10: R53.1@4309.99,1796.64 v1(4310,1823)
  Bottom Layer w7: v1(4310,1823) 4310,1305.46 ccw(c4327.95,1305.46) 4327.95,1287.5 4908.8,1287.5 ccw(c4908.8,1303.37) 4924.67,1303.37 v2(4924.67,1433.87)
P0.26: R55.1 U3.G1 | length 61.6
  Top Layer w7: v2@4696.07,1591.35 U3.G1@4737.66,1591.35
  Bottom Layer w7: R55.1@4673.72,1590.37 4673.72,1590.71 v2(4693.43,1590.71)
P0.27: R56.1 U3.H2 | length 136.5
  Bottom Layer w7: R56.1@4673.72,1640.74 4742.51,1640.74 cw(c4742.51,1625.91) 4757.35,1625.91 v2(4757.35,1581.51)
P1.01: R92.1 U3.Y23 | length 3952.1
  Top Layer w15: v1(3343,2977.68) R92.1@3343,3019.62
  Layer 2 w7: v1(3343,2977.68) 5238.26,2977.68 cw(c5238.26,2947.01) 5268.93,2947.01 5268.93,1378.75 cw(c5253.91,1378.75) 5253.91,1363.73 4985.2,1363.73 cw(c4985.2,1375.05) 4973.88,1375.05 v2(4973.88,1463.4)
P1.02: R93.1 U3.W24 | length 4411.6
  Top Layer w7: U3.W24@4993.57,1473.24 5014.33,1473.24 cw(c5014.33,1461.04) 5023.84,1468.69 v2(5030,1461.04)
  Top Layer w10: v1@2542.78,2901.53 v1@2543.24,2901.99 ; R93.1@2543.24,2960.05 R93.1@2543.71,2960.51
  Top Layer w15: v1@2543.24,2901.99 R93.1@2543.24,2960.05
  Layer 2 w7: v1@2542.78,2901.53 v1@2542.9,2901.65 ; v1@2542.9,2906.65 5199.58,2906.65 cw(c5199.58,2877.93) 5228.3,2877.93 5228.3,1476.02 cw(c5213.28,1476.02) 5213.28,1461 v2@5030,1461
  other v1: 2543.24,2906.99
P1.03: R94.1 U3.V23 | length 5174.2
  Top Layer w15: v1@1743,2872.93 R94.1@1743,2960.19
  Layer 2 w7: v1@1743.2,2877.93 5188.93,2877.93 cw(c5188.93,2853.43) 5213.43,2853.43 5213.43,1499.67 cw(c5196.84,1499.67) 5196.84,1483.09 v2(4973.88,1483.09)
  other v1: 1743,2877.73
P1.04: R95.1 U3.U24 | length 3664.3
  Top Layer w7: U3.U24@4993.57,1492.93 5114.06,1492.93 ccw(c5114.06,1502.77) 5123.9,1502.77 5123.9,1542.14 ccw(c5114.06,1542.14) 5114.06,1551.98 v2(5030,1551.98)
  Top Layer w15: v1(3517.13,3415.73) R95.1@3517.13,3458.87
  Layer 1 w7: v1(3517.13,3415.73) 4087.27,3415.73 cw(c4087.27,3395) 4108,3395 4108,1886.91 ccw(c4140.51,1886.91) 4140.51,1854.4 4955.95,1854.4 ccw(c4955.95,1861.4) 4957.98,1854.7 cw(c4963,1838) 4968.04,1854.69 ccw(c4970.05,1861.4) 4970.05,1854.4 5012.21,1854.4 cw(c5012.21,1836.61) 5030,1836.61 v2(5030,1551.98)
P1.05: R96.1 U3.T23 | length 4406.6
  Top Layer w15: v1(2717.13,3415.73) R96.1@2717.13,3457.85
  Layer 1 w7: v1(2717.13,3415.73) 2717.13,3433.68 cw(c2731.96,3433.68) 2731.96,3448.51 4110.49,3448.51 cw(c4110.49,3421) 4138,3421 4138,1908.52 ccw(c4168.86,1908.52) 4168.86,1877.65 5045.87,1877.65 cw(c5045.87,1859.9) 5063.63,1859.9 5063.63,1545.76 cw(c5052.03,1545.76) 5052.03,1534.16 4988.48,1534.16 ccw(c4988.48,1519.56) 4973.88,1519.56 v2(4973.88,1502.77)
P1.06: R97.1 U3.R24 | length 5307.7
  Top Layer w10: U3.R24@4993.57,1512.61 5030,1512.61 v2(5030,1512.69)
  Top Layer w15: v1(1917.13,3415.73) R97.1@1917.13,3457.85
  Layer 1 w7: v1(1917.13,3415.73) 1917.13,3461.93 cw(c1936.2,3461.93) 1936.2,3481 4130,3481 cw(c4130,3442) 4169,3442 4169,1930.25 ccw(c4196.6,1930.25) 4196.6,1902.65 5078.29,1902.65 cw(c5078.29,1883.94) 5097,1883.94 5097,1528 cw(c5081.69,1528) 5081.69,1512.69 v2(5030,1512.69)
P1.08: R62.1 U3.P2 | length 987.6
  Top Layer w15: v1@4676,635 R62.1@4703.44,635
  Layer 2 w7: v1(4676,635.46) 4676,1503.38 cw(c4695.08,1503.38) 4695.08,1522.46 v2(4757.35,1522.46)
P1.09: R63.1 U3.R1 | length 2662.1
  Top Layer w7: v1(4510,1507.33) cw(c4522.41,1494.91) 4522.41,1512.47 4677.06,1512.47 U3.R1@4737.66,1512.61 ; R63.1@5237.75,2791.44 5237.75,2873.87 cw(c5258.89,2873.87) 5258.89,2895 v1(5299.96,2895)
  Bottom Layer w7: v1@4510,1512.33 4510,2450 cw(c4560,2450) 4560,2500 5354.13,2500 ccw(c5354.13,2516.64) 5370.77,2516.64 5370.77,2873.41 ccw(c5349.18,2873.41) 5349.18,2895 v1(5299.96,2895)
P1.11: R64.1 U3.T2 | length 2348.2
  Top Layer w15: R64.1@5368.81,2606.35 v1(5394.73,2606.35)
  Bottom Layer w7: v2(4757.35,1502.77) 4757.35,1432.85 cw(c4737.83,1432.85) 4737.83,1413.33 4555.67,1413.33 cw(c4555.67,1435.74) 4533.26,1435.74 4533.26,2439.1 cw(c4575.16,2439.1) 4575.16,2481 5371.94,2481 ccw(c5371.94,2503.79) 5394.73,2503.79 v1(5394.73,2606.35)
P1.12: R152.1 U3.B17 | length 3527.5
  Top Layer w15: v1(3167.54,2810.28) R152.1@3167.54,2868.73
  Layer 2 w7: v1(3167.54,2810.28) 4838.13,2810.28 5175.91,2810.28 cw(c5175.97,2787.17) 5199.08,2787.17 5199.08,1665.54 cw(c5183.95,1665.54) 5183.95,1650.41 v2(4904.98,1650.41)
P1.13: R153.1 U3.A16 | length 4238.7
  Top Layer w10: U3.A16@4895.14,1670.09 v2(4895.14,1686.01)
  Top Layer w15: v1(2367.54,2787.58) R153.1@2367.54,2868.73
  Layer 2 w7: v1(2367.54,2787.58) 5142.28,2787.58 cw(c5142.28,2768.86) 5161,2768.86 5161,1734.79 cw(c5149.21,1734.79) 5149.21,1723 4909.39,1723 ccw(c4909.39,1708.75) 4895.14,1708.75 v2(4895.14,1686.01)
P1.14: R154.1 U3.B15 | length 5059.5
  Top Layer w15: v1(1567.54,2743) R154.1@1567.54,2868.73
  Layer 2 w7: v1(1567.54,2743) 4314,2743 5106.85,2743 cw(c5106.85,2716) 5133.85,2716 5133.85,1761.63 cw(c5120.22,1761.63) 5120.22,1748 4873.9,1748 ccw(c4873.9,1731.13) 4857.02,1731.13 4857.02,1664.16 ccw(c4871.02,1664.16) 4871.02,1650.16 4885.3,1650.16 v2(4885.3,1650.41)
PTT-1: R95.2 R109.2 | length 255.8
  Top Layer w10: R109.2@3404.44,3507.4 3404.44,3561.93 cw(c3424.04,3561.93) 3424.04,3581.53 3497.89,3581.53 cw(c3497.89,3562.29) 3517.13,3562.29 R95.2@3517.13,3495.87
PTT-2: R96.2 R126.2 | length 255.8
  Top Layer w10: R126.2@2604.44,3507.4 2604.44,3561.93 cw(c2624.04,3561.93) 2624.04,3581.53 2697.89,3581.53 cw(c2697.89,3562.29) 2717.13,3562.29 R96.2@2717.13,3495.87
PTT-3: R97.2 R143.2 | length 255.8
  Top Layer w10: R143.2@1804.44,3507.4 1804.44,3561.93 cw(c1824.04,3561.93) 1824.04,3581.53 1897.89,3581.53 cw(c1897.89,3562.29) 1917.13,3562.29 R97.2@1917.13,3495.87
PWR_STAT: R61.2 R67.1 U5.8 | length 88.6
  Top Layer w15: R67.1@4621.87,855.17 U5.8@4710.49,855.17
REF1: C22.2 C23.2 U1.16 | length 292.5
  Top Layer w10: U1.16@3106.34,1199.03 3106.34,1131.08 ccw(c3123.57,1131.08) 3123.57,1113.84 3194.09,1113.84 cw(c3194.09,1101.37) 3206.56,1101.37 C22.2@3206.56,1054.03 C23.2@3266.56,1054.03
RESET_ADE: C17.2 R23.2 SB1.2 U1.6 | length 278.7
  Top Layer w10: R23.2@2819.01,1180.99 ccw(c2820,1180.99) R23.2@2820,1180 ; C17.2@2819.01,1294.62 ccw(c2819.96,1294.62) C17.2@2819.96,1293.66 ; C17.2@2819.96,1303.66 U1.6@2982.03,1303.66
  Top Layer w20: R23.2@2819.01,1180.99 SB1.2@2819.01,1237.5 C17.2@2819.01,1294.62
SCLK: U1.37 U2.13 | length 1418.9
  Top Layer w10: v1(2968.94,1610.45) 3052.17,1610.45 cw(c3052.17,1595.66) 3066.97,1595.66 U1.37@3066.97,1427.97
  Top Layer w12: U2.13@3855.93,1340 U2.13@3855.93,1345.51
  Top Layer w15: U2.13@3855.93,1345.51 v1(3855.93,1402.98)
  Bottom Layer w10: v1@2971.62,1610.45 3832.63,1610.45 cw(c3832.63,1587.15) 3855.93,1587.15 v1(3855.93,1402.98)
SCR-1: R156.1 U15.6 | length 92.5
  Top Layer w10: R156.1@3226.92,3163.47 3239.42,3171.84 ccw(c3226.92,3183.72) 3244.17,3183.72 U15.6@3244.17,3248.04
SCR-2: R160.1 U16.6 | length 91.3
  Top Layer w9: R160.1@2427.34,3163.59 2440.12,3174.09 ccw(c2418.82,3187.83) 2444.17,3187.83 U16.6@2444.17,3248.04
SCR-3: R158.1 U17.6 | length 91.3
  Top Layer w9: R158.1@1626.92,3163.6 1639.7,3174.1 ccw(c1618.4,3187.84) 1643.75,3187.84 U17.6@1643.75,3248.04
SCR-SIG-1: Q7.3 R152.2 R155.2 | length 108.7
  Top Layer w12: R152.2@3167.54,2905.73 R155.2@3221.08,2905.73
  Top Layer w15: R152.2@3167.54,2905.73 Q7.3@3167.54,2960.9
SCR-SIG-2: Q9.3 R153.2 R159.2 | length 108.7
  Top Layer w12: R153.2@2367.54,2905.73 R159.2@2421.08,2905.73
  Top Layer w15: R153.2@2367.54,2905.73 Q9.3@2367.54,2960.9
SCR-SIG-3: Q8.3 R154.2 R157.2 | length 108.7
  Top Layer w12: R154.2@1567.54,2905.73 R157.2@1621.08,2905.73
  Top Layer w15: R154.2@1567.54,2905.73 Q8.3@1567.54,2960.9
SPI_MISO: R60.2 U2.6 | length 97.6
  Top Layer w20: U2.6@3755.93,1729.37 R60.2@3755.93,1826.98
SPI_MOSI: R59.2 U2.5 | length 97.6
  Top Layer w20: U2.5@3805.93,1729.37 R59.2@3805.93,1826.98
SPI_SCK: R58.2 U2.4 | length 97.6
  Top Layer w20: U2.4@3855.93,1729.37 R58.2@3855.93,1826.98
SPI_SS: R57.2 U2.3 | length 97.6
  Top Layer w20: U2.3@3905.93,1729.37 R57.2@3905.93,1826.98
SS: U1.40 U2.14 | length 1577.3
  Top Layer w10: v1(2968.94,1516) 2995.12,1516 cw(c2995.12,1503.2) 3007.92,1503.2 U1.40@3007.92,1427.97 ; U2.14@3905.93,1340 U2.14@3905.93,1345.51
  Top Layer w15: U2.14@3905.93,1345.51 v1(3905.93,1402.98)
  Bottom Layer w10: v1(2968.94,1516) 2916,1516 ccw(c2916,1500) 2900,1500 2900,1312.1 ccw(c2926.45,1312.1) 2926.45,1285.64 3878.74,1285.64 ccw(c3878.74,1313.03) 3906.13,1313.03 v1@3906.13,1402.98
SWDCLK: D8.5 J4.4 U3.AA24 | length 2639.4
  Top Layer w7: U3.AA24@4993.57,1453.56 5007.45,1453.56 cw(c5007.45,1443.3) 5017.71,1443.3 5017.71,1437.98 ccw(c5027.23,1437.98) 5027.23,1428.46 v2(5105,1428.46)
  Top Layer w10: v1(4596,2312) 4596,2312.53 D8.5@4625.02,2312.53 4625.02,2412.11 cw(c4647.48,2412.11) 4647.48,2434.56 5040.14,2434.56 cw(c5040.14,2414.71) 5060,2414.71 5060,2258 cw(c5039.73,2258) 5039.73,2237.73 4951.21,2237.73 ccw(c4951.21,2194.28) 4920.51,2225.03 J4.4@4895.61,2200.13
  Bottom Layer w10: v1(4596,2312) 4596,2391 cw(c4625,2391) 4625,2420 5060,2420 cw(c5060,2375) 5105,2375 v2(5105,1428.46)
SWDIO: D8.4 J4.2 U3.AC24 | length 2078.7
  Top Layer w7: U3.AC24@4993.57,1433.87 4993.57,1421.08 ccw(c5003.41,1421.08) 5003.41,1411.24 v2(5079.61,1411.24)
  Top Layer w10: v1(4676.2,2278.26) D8.4@4676.2,2312.53 4676.2,2379.19 cw(c4696.02,2379.19) 4696.02,2399 4884.66,2399 cw(c4884.66,2376.39) 4907.27,2376.39 4907.27,2278.26 cw(c4867.48,2278.26) J4.2@4895.61,2250.13
  Bottom Layer w10: v1(4676.2,2278.26) 4676.2,2373.35 cw(c4701.85,2373.35) 4701.85,2399 5051,2399 cw(c5051,2370.39) 5079.61,2370.39 v2(5079.61,1411.24)
SWO: D8.1 J4.6 U3.AD22 | length 3106
  Top Layer w7: U3.AD22@4954.2,1414.19 4954.2,1257.5 ccw(c4967.18,1257.5) 4967.18,1244.52 5139.21,1244.52 ccw(c5139.21,1255.31) 5150,1255.31 v2(5150,1390)
  Top Layer w10: v1(4625.02,2197) D8.1@4625.02,2237.73 cw(c4624.29,2237.73) 4624.29,2237 4604,2237 ccw(c4604,2220) 4587,2220 4587,2047 ccw(c4605,2047) 4605,2029 4847,2029 ccw(c4847,2052.61) 4870.61,2052.61 4870.61,2089.77 cw(c4955.97,2089.77) J4.6@4895.61,2150.13
  Bottom Layer w10: v1(4625.02,2197) 4578,2197 cw(c4578,2215) 4560,2215 4560,2415 cw(c4595,2415) 4595,2450 5118.69,2450 cw(c5118.69,2418.69) 5150,2418.69 v2(5150,1390)
TYPEC_CC1: J1.A5 R71.1 | length 84.5
  Top Layer w10: J1.A5@5212.5,1042.29 v1@5264,1042.29
  Bottom Layer w15: v1(5264,1041.89) R71.1@5297,1041.89
TYPEC_CC2: J1.B5 R72.1 | length 84.9
  Top Layer w8: v1(5264,1160) v1@5264,1160.4
  Top Layer w10: J1.B5@5212.5,1160.4 v1@5264,1160.4
  Bottom Layer w15: v1(5264,1160) R72.1@5297,1160
TYPEC_D_N: J1.A7 J1.B7 U8.1 | length 233.6
  Top Layer w8: U8.1@5098.57,1054.1 cw(c5106.45,1054.1) 5106.45,1061.98 5244.88,1061.98 ccw(c5244.88,1071.72) 5254.62,1071.72 5254.62,1091.5 ccw(c5244.78,1091.5) 5244.78,1101.35 J1.A7@5212.5,1101.35
TYPEC_D_P: J1.A6 J1.B6 U8.3 | length 215.9
  Top Layer w8: U8.3@5098.57,1128.91 ccw(c5106.45,1128.91) 5106.45,1121.03 5180.71,1121.03 ; 5161.29,1121.03 cw(c5161.29,1111.32) 5171,1111.32 ; J1.A6@5212.5,1081.66 5180.84,1081.66 cw(c5180.84,1091.5) 5171,1091.5 5171,1111.32 ; J1.B6@5212.5,1121.03 5180.71,1121.03 ; 5171,1111.32 cw(c5180.71,1111.32) 5180.71,1121.03
TYPEC_N: U3.AD4 U8.6 | length 557.1
  Top Layer w8: U3.AD4@4777.03,1414.19 cw(c4777.03,1410.85) 4780.37,1410.85 4780.37,1115.67 ccw(c4811.54,1115.67) 4811.54,1084.5 4910.5,1084.5 cw(c4910.5,1072.3) 4922.7,1072.3 4922.7,1062.57 ccw(c4932.16,1062.57) 4932.16,1053.1 U8.6@4997.13,1053.1
TYPEC_P: U3.AD6 U8.4 | length 535
  Top Layer w8: U3.AD6@4796.72,1414.19 ccw(c4796.72,1410.85) 4793.37,1410.85 4793.37,1115.67 ccw(c4811.54,1115.67) 4811.54,1097.5 4908.8,1097.5 ccw(c4908.8,1109.71) 4921,1109.71 4921,1119.44 cw(c4930.46,1119.44) 4930.46,1128.91 U8.4@4995.43,1128.91
V-OR: C56.1 C59.2 U5.2 U5.7 U6.5
  other v1: 4507.01,642.5 4490.23,672.03 4524.79,672.03 4507.01,701.56
VA_INPUT: FB1.1 J2.1 R98.1 R101.1 R103.1 R110.1 R113.1 R114.1 RV1.2 | length 5653.3
  Top Layer w20: R103.1@828.48,1194.96 cw(c909.34,1194.96) 909.34,1275.82 1473.22,1275.82 ccw(c1473.22,1312.59) 1506.24,1296.41 ccw(c1473.22,1312.59) 1509.99,1312.59 1509.99,1464.55 cw(c1545.44,1464.55) 1545.44,1500 2439.62,1500 ccw(c2439.62,1538.58) 2478.2,1538.58 2478.2,2109.04 ; R110.1@2478.2,2229.92 2478.2,2176.39 ; 2481.88,2142.72 R113.1@2608.2,2142.72 ; 2478.2,2109.04 cw(c2511.88,2109.04) 2511.88,2142.72 cw(c2511.88,2176.39) 2478.2,2176.39 ; 2478.2,2109.04 2478.2,2176.39
  Top Layer w30: R113.1@2638.2,2142.72 R114.1@2804.87,2142.72
  Top Layer w60: R98.1@802.82,291 RV1.2@1131.47,291 ; R98.1@802.82,354.89 R103.1@802.82,1099.36
  Bottom Layer w40: FB1.1@336.39,70.08 336.39,29.08 ccw(c387.19,29.08) 387.19,-21.72 1319.56,-21.72 J2.1@1356.1,14.82 cw(c1356.1,30.92) 1340,30.92 1340,245 ccw(c1294,245) 1294,291 RV1.2@1131.47,291
VA_N: C26.2 C28.2 R35.2 U1.19 | length 4383
  Top Layer w10: v1(3165.4,1151.65) U1.19@3165.4,1199.03
  Bottom Layer w10: C28.2@77.78,1496.61 ccw(c77.78,1513.38) C28.2@94.55,1513.38 ; C28.2@84.39,1523.55 C28.2@94.55,1533.71 ; C26.2@171.39,1533.72 171.39,1650.73 cw(c193.27,1650.73) 193.27,1672.62 1266.71,1672.62 cw(c1266.71,1656.25) 1283.08,1656.25 1283.08,1165.5 ccw(c1296.92,1165.5) 1296.92,1151.65 v1(3165.4,1151.65)
  Bottom Layer w20: C28.2@77.78,1496.61 36.55,1496.61 ccw(c36.55,1467.32) 7.26,1467.32 7.26,1125.12 ccw(c107.26,1125.12) R35.2@107.26,1025.12 ; C28.2@94.55,1533.71 C26.2@171.39,1533.72
VA_P: C26.1 C27.2 R33.2 R34.2 U1.20 | length 4553.6
  Top Layer w10: U1.20@3185.08,1199.03 3203.58,1199.03 cw(c3203.58,1185.94) 3216.67,1185.94 v1(3216.67,1151.65)
  Bottom Layer w10: C26.1@231.39,1533.72 231.39,1628.58 cw(c248.06,1628.58) 248.06,1645.25 1245.89,1645.25 cw(c1245.89,1630.69) 1260.45,1630.69 1260.45,1136.09 ccw(c1275.97,1136.09) 1275.97,1120.57 3205.87,1120.57 ccw(c3205.87,1131.38) 3216.67,1131.38 v1(3216.67,1151.65) ; C27.2@289.59,1496.61 ccw(c289.59,1513.38) C27.2@306.36,1513.38 ; C27.2@293.14,1526.6 C27.2@295.98,1529.45 ; C27.2@305.4,1533.72 cw(c306.36,1519.08) C27.2@306.36,1533.75
  Bottom Layer w20: C26.1@231.39,1533.72 C27.2@305.4,1533.72 ; C27.2@289.59,1496.61 231.39,1496.61 ccw(c231.39,1467.23) 202.01,1467.23 202.01,1123.42 ccw(c300.3,1123.42) R34.2@303.62,1025.18
  Bottom Layer w40: R33.2@299.37,878.96 R34.2@299.37,1020.04
VB_INPUT: FB2.1 J2.2 R115.1 R118.1 R120.1 R127.1 R130.1 R131.1 RV2.2 | length 6919.4
  Top Layer w15: R118.1@1129.98,916.95 R120.1@1503.55,916.95 ; R120.1@1461.84,875.23 R120.1@1503.55,916.95 ; R115.1@1880.31,916.95 R120.1@1505.15,916.95 R120.1@1503.55,916.95
  Top Layer w20: FB2.1@334.58,72.94 334.58,-59.03 ccw(c365.55,-59.03) 365.55,-90 1440.95,-90 ccw(c1441.03,-15.01) 1494.01,-68.08 1556.1,-5.99 J2.2@1556.1,14.82 ; R131.1@1355,2229.94 1355,2180 cw(c1322.63,2180) 1322.63,2147.63 497.78,2147.63 ccw(c497.78,2113.87) 464.01,2113.87 464.01,148.3 ccw(c500,148.3) 500,112.31 945.46,112.31 ccw(c945.46,206.85) 1012.31,140 1048.01,175.7 cw(c1118.72,104.99) 1118.72,204.99 1261.37,204.99 ccw(c1261.37,291) 1347.12,284.34 1359.09,291 RV2.2@1461.84,291
  Top Layer w30: R131.1@1355,2229.94 R127.1@1674.47,2229.92
  Bottom Layer w40: RV2.2@1461.84,291 cw(c1461.84,196.74) 1556.1,196.74 J2.2@1556.1,14.82
VB_N: C29.2 C31.2 R41.2 U1.21 | length 4474.3
  Top Layer w10: U1.21@3210.97,1224.92 3233.17,1224.92 cw(c3233.17,1210.1) 3247.99,1210.1 v1(3247.99,1151.65)
  Top Layer w15: C29.2@171.39,1533.72 171.39,1600.67 cw(c188.61,1600.67) 188.61,1617.89 v1(271.36,1617.89)
  Top Layer w20: C31.2@87.3,1531.35 33.57,1477.63 ccw(c88.9,1422.25) 10.62,1422.19 10.62,1109.67 ccw(c86.43,1109.67) 44.46,1046.54 R41.2@106.39,1020.04 ; C31.2@96.39,1533.71 C29.2@171.39,1533.72
  Bottom Layer w10: v1(271.36,1617.89) 1221.86,1617.89 cw(c1221.86,1601.93) 1237.82,1601.93 1237.82,1114.26 ccw(c1251.97,1114.26) 1251.97,1100.12 3232.91,1100.12 ccw(c3232.91,1115.2) 3247.99,1115.2 v1(3247.99,1151.65)
VB_P: C29.1 C30.2 R39.2 R40.2 U1.22 | length 4565
  Top Layer w10: U1.22@3210.97,1244.6 3265.14,1244.6 cw(c3265.14,1230.44) 3279.31,1230.44 v1(3279.31,1151.65)
  Top Layer w15: C30.2@306.39,1533.88 306.23,1533.88 306.23,1575.39 cw(c321.36,1575.39) 321.36,1590.53 v1(370,1590.53)
  Top Layer w20: C29.1@231.39,1533.72 C30.2@301.23,1533.72 ; R40.2@296.39,1020.04 cw(c296.39,1116.19) 200.24,1116.19 200.24,1386.31 cw(c311.94,1386.31) 232.96,1465.29 276.39,1508.73 276.39,1508.88 C30.2@301.23,1533.72 ; C30.2@306.23,1533.88 301.39,1533.88 C30.2@301.23,1533.72
  Top Layer w40: R39.2@296.39,878.96 R40.2@296.39,1020.04
  Bottom Layer w10: v1(370,1590.53) 1200.64,1590.53 cw(c1200.64,1575.97) 1215.2,1575.97 1215.2,1094.19 ccw(c1229.86,1094.19) 1229.86,1079.53 3265.95,1079.53 ccw(c3265.95,1092.89) 3279.31,1092.89 v1(3279.31,1151.65)
VBAT: C65.2 C66.2 L7.2 R74.2 TP1.1 U5.6 U10.2 U10.3 | length 397.2
  Top Layer w10: L7.2@4940.23,333.98 5335.75,333.98 ccw(c5335.75,336.13) TP1.1@5337.28,334.61
  other v1: 4743.59,901.14 4743.59,936.63
VBUS: C54.2 C64.1 FB5.2 R68.2 R70.2 R73.1 U3.AD2 U5.3 U5.5 U9.1 U9.5 | length 692.3
  Top Layer w10: C54.2@4653.77,1391.38 4744.85,1391.38 ; U3.AD2@4757.35,1414.19 4757.35,1403.88 ; 4795,912 4795,962.01 ccw(c4724.58,962.01) 4774.37,1011.81 cw(c4815.48,1052.92) 4758.67,1040.59 cw(c4815.48,1052.92) 4757.35,1052.92 4757.35,1378.88 ; 4744.85,1391.38 cw(c4744.85,1378.88) 4757.35,1378.88 ; 4744.85,1391.38 ccw(c4744.85,1403.88) 4757.35,1403.88 ; 4757.35,1378.88 4757.35,1403.88
  Top Layer w20: v1(4620.33,114.72) U9.5@4620.33,164.41
  other v1: 4620.33,49.73 4620.33,82.23 4324.76,346 4358,346 4324.76,393.24 4358,393.24 4959,831.41 4808.14,863.91 4843.64,863.91 4959,863.91
VBUS-TYPEC: C63.1 FB5.1 J1.A4/B9 J1.B4/A9 U8.5 | length 265.6
  Top Layer w8: FB5.1@4902,932.37 cw(c4917.62,932.37) FB5.1@4917.62,947.99 ; U8.5@4995.42,1091.5 U8.5@4995.57,1091.65 ; J1.A4/B9@5209.5,1000.02 J1.A4/B9@5212.5,997.02
  Top Layer w16: C63.1@5122.59,997.02 v1@5162,997.02
  Top Layer w20: v1@5162,997.02 J1.A4/B9@5212.5,997.02 ; v1@5162,1185.99 J1.B4/A9@5212.5,1185.99
  Top Layer w22: v1(4948.2,1091.65) 4995.57,1091.65 U8.5@4999.78,1091.65 ; U8.5@4996.42,1091.5 v1(5041,1091.5)
  other v1: 4959,951.5 4959,984 4888.5,985.2 4923,985.2 5158,1001.02 5158,1033.52 5158,1149.49 5158,1181.98